# Allegro board 980XS-I6K51D-11120.brd

Outline 581.66 x 429.26 mm; copper layers: TOP, L02_GND, L03_DPS, L04_GND, L05_DPS, L06_GND, L07_DPS, L08_GND, L09_DPS, L10_GND, L11_DPS, L12_GND, L13_SIGNAL, L14_GND, L15_SIGNAL, L16_GND, L17_SIGNAL, L18_GND, L19_SIGNAL, L20_GND, L21_SIGNAL, L22_GND, L23_SIGNAL, L24_GND, L25_SIGNAL, L26_GND, L27_SIGNAL, L28_GND, L29_SIGNAL, L30_GND, L31_SIGNAL, L32_GND, L33_SIGNAL, L34_GND, L35_DPS, L36_UDB, L37_GND, BOTTOM. Coordinates in mm from the lower left corner of the outline.
Outline path: 0,429.26 206.45,429.26 arc(217.17,423.61) 227.89,429.26 353.77,429.26 arc(364.49,423.61) 375.21,429.26 581.66,429.26 581.66,0 301.55,0 arc(290.83,5.65) 280.11,0 0,0 0,429.26

## Placement (name value [footprint] x y rotation side)
BD5  BD120-1.5A-S4-MU  [FB0402]  543.47 239.79 270 bottom
BD9  BD120-1.5A-S4-MU  [FB0402]  224.66 243.83 270 bottom
BD21  BD120-1.5A-S4-MU  [FB0402]  222.95 232.36 0 bottom
BD1721  BD120-1.5A-S4-MU  [FB0402]  543.47 226.84 270 bottom
BD1722  BD120-1.5A-S4-MU  [FB0402]  543.09 213.5 270 bottom
BD1723  BD120-1.5A-S4-MU  [FB0402]  543.09 199.41 270 bottom
BD1728  BD120-1.5A-S4-MU  [FB0402]  245.15 273.73 180 bottom
BDB5  BD120-1.5A-S4-MU  [FB0402]  232.36 264.33 270 bottom
BDB6  BD120-1.5A-S4-MU  [FB0402]  220.55 264.33 270 bottom
BDB7  BD120-1.5A-S4-MU  [FB0402]  211.03 234.89 0 bottom
BDB8  BD120-1.5A-S4-MU  [FB0402]  211.03 246.46 0 bottom
BGA293-9X7-P0.4  REF-CODE-SOCKET  [SOCKET_CODE]  284.21 469.34 0 top
C262  0.1U-16-X7S-S2-MU  [C0201]  224.41 232.06 270 bottom
C264  NC/10U-16-X7R-S8-SS  [C0805]  243.28 276.07 0 bottom
C267  33P-50-N-S2-MU  [C0201]  236.23 224.18 270 bottom
C268  33P-50-N-S2-MU  [C0201]  235.23 224.18 270 bottom
C271  12P-50-N-S4-MU  [C0402]  240.52 270.61 90 bottom
C272  12P-50-N-S4-MU  [C0402]  240.52 272.63 270 bottom
C278  1U-10-X7S-S4-TDK  [C0402]  232.87 293.11 0 bottom
C279  1U-10-X7S-S4-TDK  [C0402]  232.87 291.92 0 bottom
C280  0.1U-16-X-S4-MU  [C0402]  232.87 290.72 0 bottom
C281  0.1U-16-X-S4-MU  [C0402]  232.87 289.53 0 bottom
C282  1U-10-X7S-S4-TDK  [C0402]  238.7 286.48 270 bottom
C283  0.1U-16-X-S4-MU  [C0402]  237.54 286.48 270 bottom
C284  1U-10-X7S-S4-TDK  [C0402]  237.62 297.85 90 bottom
C285  0.1U-16-X-S4-MU  [C0402]  238.81 297.85 90 bottom
C286  0.1U-16-X-S4-MU  [C0402]  233.82 297.35 180 bottom
C288  1000P-50-X7R-S2-MU  [C0201]  233.49 295.57 270 bottom
C289  0.1U-16-X-S4-MU  [C0402]  231.21 294.81 270 bottom
C290  NC/0.1U-16-X7R-S4-TY  [C0402]  224.35 296.03 180 bottom
C298  0.1U-16-X7S-S2-MU  [C0201]  222.95 292.65 90 bottom
C299  0.1U-16-X7S-S2-MU  [C0201]  220.02 296.97 180 bottom
C300  0.1U-16-X-S4-MU  [C0402]  220.67 290.87 270 bottom
C301  1U-10-X7S-S4-TDK  [C0402]  219.51 290.87 270 bottom
C302  10P-50-N-S2-MU  [C0201]  229.27 260.38 270 bottom
C309  10P-50-N-S2-MU  [C0201]  241.08 260.38 270 bottom
C310  10P-50-N-S2-MU  [C0201]  241.08 261.68 90 bottom
C318  10P-50-N-S2-MU  [C0201]  241.08 263.42 270 bottom
C320  10P-50-N-S2-MU  [C0201]  229.27 261.68 90 bottom
C332  2.2U-16-X7R-S6-TY  [C0603]  109.1 226.65 270 bottom
C333  0.1U-16-X-S4-MU  [C0402]  107.7 226.83 270 bottom
C334  10U-16-X7R-S8-SS  [C0805]  100.08 226.53 90 bottom
C335  0.1U-16-X-S4-MU  [C0402]  101.74 226.35 90 bottom
C336  4.7U-25-X7R-S8-TY  [C0805]  87.58 240.29 270 bottom
C337  0.1U-16-X-S4-MU  [C0402]  87.6 237.74 180 bottom
C338  4.7U-25-X7R-S8-TY  [C0805]  106 240.29 270 bottom
C339  0.1U-16-X-S4-MU  [C0402]  106.03 237.74 180 bottom
C400  2.2U-10-X-S4-MU  [C0402]  540.94 239.82 90 bottom
C401  0.1U-16-X-S4-MU  [C0402]  542.2 239.82 90 bottom
C402  4.7U-6.3-X-S4-MU  [C0402]  523.51 152.12 0 bottom
C403  22U-16-X5R-SA-SS  [C1206]  520.12 149.58 90 bottom
C404  10U-25-X-S6-MU  [C0603]  519.86 146.58 180 bottom
C405  1U-10-X7S-S4-TDK  [C0402]  520.37 145.26 180 bottom
C406  0.1U-16-X-S4-MU  [C0402]  90.42 287.53 180 bottom
C407  2.2U-10-X-S4-MU  [C0402]  82.6 288.09 270 bottom
C408  0.1U-16-X-S4-MU  [C0402]  83.74 288.09 270 bottom
C409  0.1U-16-X-S4-MU  [C0402]  73.71 296.14 0 bottom
C410  0.1U-16-X-S4-MU  [C0402]  508.66 225.73 270 bottom
C411  0.1U-16-X-S4-MU  [C0402]  498.63 233.78 0 bottom
C412  2.2U-10-X-S4-MU  [C0402]  507.51 225.73 270 bottom
C413  0.1U-16-X-S4-MU  [C0402]  515.33 225.16 180 bottom
C415  0.1U-16-X-S4-MU  [C0402]  90.42 273.81 180 bottom
C416  2.2U-10-X-S4-MU  [C0402]  82.6 274.38 270 bottom
C417  0.1U-16-X-S4-MU  [C0402]  73.71 282.43 0 bottom
C475  4.7U-6.3-X-S4-MU  [C0402]  256.72 272.09 270 bottom
C476  1U-10-X7S-S4-TDK  [C0402]  249.86 275.23 90 bottom
C477  10U-25-X-S6-MU  [C0603]  251.18 275.74 90 bottom
C478  22U-16-X5R-SA-SS  [C1206]  254.18 275.49 0 bottom
C894  0.1U-16-X-S4-MU  [C0402]  542.2 226.87 90 bottom
C895  2.2U-10-X-S4-MU  [C0402]  540.94 226.87 90 bottom
C910  0.1U-16-X-S4-MU  [C0402]  83.74 274.38 270 bottom
C922  0.1U-16-X-S4-MU  [C0402]  232.36 262.2 270 bottom
C923  0.1U-16-X-S4-MU  [C0402]  220.55 262.2 270 bottom
C924  10P-50-N-S2-MU  [C0201]  229.27 263.42 270 bottom
C955  0.1U-16-X-S4-MU  [C0402]  90.42 260.1 180 bottom
C956  2.2U-10-X-S4-MU  [C0402]  82.6 260.66 270 bottom
C957  0.1U-16-X-S4-MU  [C0402]  73.71 268.71 0 bottom
C958  0.1U-16-X-S4-MU  [C0402]  83.74 260.66 270 bottom
C983  0.1U-16-X-S4-MU  [C0402]  541.82 213.53 90 bottom
C984  2.2U-10-X-S4-MU  [C0402]  540.55 213.53 90 bottom
C985  0.1U-16-X-S4-MU  [C0402]  541.82 199.44 90 bottom
C986  2.2U-10-X-S4-MU  [C0402]  540.55 199.44 90 bottom
C1074  0.1U-16-X7S-S2-MU  [C0201_MINI]  243.6 273.98 90 bottom
C1082  0.1U-16-X-S4-MU  [C0402]  508.66 207.57 270 bottom
C1083  0.1U-16-X-S4-MU  [C0402]  248.15 224.79 0 bottom
C1085  2.2U-10-X-S4-MU  [C0402]  498.63 215.62 0 bottom
C1086  10P-50-N-S2-MU  [C0201]  214.98 255.18 0 bottom
C1087  10P-50-N-S2-MU  [C0201]  213.69 255.18 180 bottom
C1088  10P-50-N-S2-MU  [C0201]  211.94 255.18 0 bottom
C1089  0.1U-16-X-S4-MU  [C0402]  213.16 234.89 0 bottom
C1090  0.1U-16-X-S4-MU  [C0402]  213.16 246.46 0 bottom
C1091  10P-50-N-S2-MU  [C0201]  213.69 243.61 180 bottom
C1093  10P-50-N-S2-MU  [C0201]  214.98 243.61 0 bottom
CA1  0.1U-16-X-S4-MU  [C0402]  205.72 237.49 0 bottom
CA2  10U-25-X7R-SA  [C1206]  205.72 240.03 0 bottom
CA7  10U-25-X7R-SA  [C1206]  245.12 285.5 0 bottom
CA8  0.1U-16-X-S4-MU  [C0402]  245.12 283.46 0 bottom
CA19  470U-25-E-S10.4X10.4  [EC_10P3X10_S]  189.66 230.89 90 bottom
CA20  10U-25-X7R-SA  [C1206]  216.67 285.5 0 bottom
CA21  0.1U-16-X-S4-MU  [C0402]  216.67 283.46 0 bottom
CA22  10U-25-X7R-SA  [C1206]  222.76 281.43 0 bottom
CA23  0.1U-16-X-S4-MU  [C0402]  222.76 279.4 0 bottom
CA24  10U-25-X7R-SA  [C1206]  216.67 281.43 0 bottom
CA25  0.1U-16-X-S4-MU  [C0402]  216.67 279.4 0 bottom
CA26  10U-25-X7R-SA  [C1206]  235.18 281.43 0 bottom
CA27  0.1U-16-X-S4-MU  [C0402]  235.18 279.4 0 bottom
CA34  10U-25-X7R-SA  [C1206]  245.12 281.43 0 bottom
CA35  0.1U-16-X-S4-MU  [C0402]  245.12 279.4 0 bottom
CA36  0.1U-16-X-S4-MU  [C0402]  228.85 279.4 0 bottom
CA37  10U-25-X7R-SA  [C1206]  228.85 281.43 0 bottom
CA38  10U-25-X7R-SA  [C1206]  188.01 283.69 0 top
CA39  0.1U-16-X-S4-MU  [C0402]  206.26 242.54 0 top
CB1  0.1U-25-X-S6  [C0603]  416.81 133.35 0 bottom
CB2  10U-25-X7R-SA  [C1206]  416.81 130.81 0 bottom
CB3  0.1U-25-X-S6  [C0603]  560.07 133.35 0 bottom
CB4  10U-25-X7R-SA  [C1206]  560.07 130.81 0 bottom
CB5  0.1U-25-X-S6  [C0603]  560.07 295.91 180 bottom
CB6  10U-25-X7R-SA  [C1206]  560.07 298.45 180 bottom
CB7  0.1U-25-X-S6  [C0603]  424.16 290.83 180 bottom
CB8  10U-25-X7R-SA  [C1206]  424.16 293.37 180 bottom
CB9  0.1U-25-X-S6  [C0603]  164.85 133.35 0 bottom
CB10  10U-25-X7R-SA  [C1206]  164.85 130.81 0 bottom
CB11  0.1U-25-X-S6  [C0603]  157.46 290.83 180 bottom
CB12  10U-25-X7R-SA  [C1206]  157.46 293.37 180 bottom
CB13  0.1U-25-X-S6  [C0603]  21.59 133.35 0 bottom
CB14  10U-25-X7R-SA  [C1206]  21.59 130.81 0 bottom
CB15  0.1U-25-X-S6  [C0603]  21.59 295.91 180 bottom
CB16  10U-25-X7R-SA  [C1206]  21.59 298.45 180 bottom
CC1  0.1U-16-X7S-S2-MU  [C0201_MINI]  230.19 246.91 180 bottom
CC2  0.1U-16-X7S-S2-MU  [C0201_MINI]  230.5 250.48 90 bottom
CC3  0.1U-16-X7S-S2-MU  [C0201_MINI]  228.87 245.61 180 bottom
CC4  0.1U-16-X7S-S2-MU  [C0201_MINI]  230.19 246.26 180 bottom
CC5  0.1U-16-X7S-S2-MU  [C0201_MINI]  231.16 246.56 90 bottom
CC6  0.1U-16-X7S-S2-MU  [C0201_MINI]  228.87 244.96 180 bottom
CC7  0.1U-16-X7S-S2-MU  [C0201_MINI]  232.14 244.96 0 bottom
CC8  0.1U-16-X7S-S2-MU  [C0201_MINI]  230.5 243.97 270 bottom
CC9  0.1U-16-X7S-S2-MU  [C0201_MINI]  231.16 243.97 270 bottom
CC12  0.1U-16-X7S-S2-MU  [C0201_MINI]  229.86 244.62 270 bottom
CC13  0.1U-16-X7S-S2-MU  [C0201_MINI]  228.24 241.05 180 bottom
CC14  0.1U-16-X7S-S2-MU  [C0201_MINI]  231.46 245.61 0 bottom
CC15  0.1U-16-X7S-S2-MU  [C0201_MINI]  230.19 245.61 180 bottom
CC16  0.1U-16-X7S-S2-MU  [C0201_MINI]  230.84 244.96 180 bottom
CC70  0.1U-16-X7S-S2-MU  [C0201_MINI]  232.46 242.67 270 bottom
CC71  0.1U-16-X7S-S2-MU  [C0201_MINI]  235.38 243 0 bottom
CC73  0.1U-16-X7S-S2-MU  [C0201_MINI]  227.91 242.68 90 bottom
CC84  0.1U-16-X7S-S2-MU  [C0201_MINI]  233.11 250.48 90 bottom
CC85  0.1U-16-X7S-S2-MU  [C0201_MINI]  231.15 250.48 90 bottom
CC86  0.1U-16-X7S-S2-MU  [C0201_MINI]  232.46 250.48 90 bottom
CC87  0.1U-16-X7S-S2-MU  [C0201_MINI]  232.14 246.26 180 bottom
CC88  0.1U-16-X7S-S2-MU  [C0201_MINI]  233.11 244 270 bottom
CC89  0.1U-16-X7S-S2-MU  [C0201_MINI]  227.91 244.66 270 bottom
CC90  0.1U-16-X7S-S2-MU  [C0201_MINI]  231.8 250.48 90 bottom
CC91  0.1U-16-X7S-S2-MU  [C0201_MINI]  234.06 243.65 0 bottom
CC92  0.1U-16-X7S-S2-MU  [C0201_MINI]  232.45 244 270 bottom
CC96  0.1U-16-X7S-S2-MU  [C0201_MINI]  231.51 247.56 180 bottom
CC101  0.1U-16-X7S-S2-MU  [C0201_MINI]  230.84 240.4 0 bottom
CC103  0.1U-16-X7S-S2-MU  [C0201_MINI]  231.81 242.02 90 bottom
CC105  0.1U-16-X7S-S2-MU  [C0201_MINI]  232.46 240.72 270 bottom
CC112  0.1U-16-X7S-S2-MU  [C0201_MINI]  235.06 250.48 90 bottom
CC130  0.1U-16-X7S-S2-MU  [C0201_MINI]  228.24 241.7 180 bottom
CC182  0.1U-16-X7S-S2-MU  [C0201_MINI]  226.61 250.48 90 bottom
CC195  4.7U-25-X7R-S8-TY  [C0805]  187.38 280.77 0 top
CC202  0.1U-16-X7S-S2-MU  [C0201_MINI]  226.28 245.61 180 bottom
CC211  0.1U-16-X7S-S2-MU  [C0201_MINI]  230.5 242.02 90 bottom
CC212  0.1U-16-X7S-S2-MU  [C0201_MINI]  229.53 241.06 180 bottom
CC213  0.1U-16-X7S-S2-MU  [C0201_MINI]  231.16 242.02 90 bottom
CC214  0.1U-16-X7S-S2-MU  [C0201_MINI]  192.95 287.28 90 top
CC215  0.1U-16-X7S-S2-MU  [C0201_MINI]  231.81 239.42 90 bottom
CC216  0.1U-16-X7S-S2-MU  [C0201_MINI]  228.56 238.78 270 bottom
CC217  0.1U-16-X7S-S2-MU  [C0201_MINI]  194.35 287.28 90 top
CC218  0.1U-16-X7S-S2-MU  [C0201_MINI]  195.75 287.28 90 top
CC219  0.1U-16-X7S-S2-MU  [C0201_MINI]  197.15 287.28 90 top
CC220  0.1U-16-X7S-S2-MU  [C0201_MINI]  198.56 287.28 90 top
CON1  MS-PWR-CONN-30P-V3-SI6D70  [CONN_15X2_100MIL_PH_MS_V2]  24.74 150.36 90 top
CSDPS303  V93K_CSDPS_DPS32  [PG_VG93K_PF_DPS32_G1D303]  327.66 46.99 0 top
CSDPS307  V93K_CSDPS_DPS32  [PG_VG93K_PF_DPS32_G1D307]  401.32 46.99 0 top
CSDPS310  V93K_CSDPS_DPS32  [PG_VG93K_PF_DPS32_G2D310]  401.32 361.95 0 top
CSDPS314  V93K_CSDPS_DPS32  [PG_VG93K_PF_DPS32_G2D314]  327.66 361.95 0 top
CSDPS319  V93K_CSDPS_DPS32  [PG_VG93K_PF_DPS32_G3D319]  180.34 46.99 0 top
CSDPS323  V93K_CSDPS_DPS32  [PG_VG93K_PF_DPS32_G3D323]  254 46.99 0 top
CSDPS426  V93K_CSDPS  [PG_VG93K_PF_DPS32_G8D426]  254 361.95 0 top
CSDPS430  V93K_CSDPS  [PG_VG93K_PF_DPS32_G8D430]  180.34 361.95 0 top
D101  V93K_CH  [PG_VG93K_F_G1D101]  327.66 97.79 0 top
D102  V93K_CH  [PG_VG93K_F_G1D102]  327.66 77.47 0 top
D103  V93K_CH  [PG_VG93K_F_G1D103]  327.66 57.15 0 top
D104  V93K_CH  [PG_VG93K_F_G1D104]  327.66 36.83 0 top
D105  V93K_CH  [PG_VG93K_F_G1D105]  401.32 97.79 0 top
D106  V93K_CH  [PG_VG93K_F_G1D106]  401.32 77.47 0 top
D107  V93K_CH  [PG_VG93K_F_G1D107]  401.32 57.15 0 top
D108  V93K_CH  [PG_VG93K_F_G1D108]  401.32 36.83 0 top
D109  V93K_CH  [PG_VG93K_F_G2D109]  401.32 331.47 0 top
D110  V93K_CH  [PG_VG93K_F_G2D110]  401.32 351.79 0 top
D111  V93K_CH  [PG_VG93K_F_G2D111]  401.32 372.11 0 top
D112  V93K_CH  [PG_VG93K_F_G2D112]  401.32 392.43 0 top
D113  V93K_CH  [PG_VG93K_F_G2D113]  327.66 331.47 0 top
D114  V93K_CH  [PG_VG93K_F_G2D114]  327.66 351.79 0 top
D115  V93K_CH  [PG_VG93K_F_G2D115]  327.66 372.11 0 top
D116  V93K_CH  [PG_VG93K_F_G2D116]  327.66 392.43 0 top
D117  V93K_CH  [PG_VG93K_F_G3D117]  180.34 97.79 0 top
D118  V93K_CH  [PG_VG93K_F_G3D118]  180.34 77.47 0 top
D119  V93K_CH  [PG_VG93K_F_G3D119]  180.34 57.15 0 top
D120  V93K_CH  [PG_VG93K_F_G3D120]  180.34 36.83 0 top
D121  V93K_CH  [PG_VG93K_F_G3D121]  254 97.79 0 top
D122  V93K_CH  [PG_VG93K_F_G3D122]  254 77.47 0 top
D123  V93K_CH  [PG_VG93K_F_G3D123]  254 57.15 0 top
D124  V93K_CH  [PG_VG93K_F_G3D124]  254 36.83 0 top
D125  V93K_CH  [PG_VG93K_F_G4D125]  33.02 97.79 0 top
D126  V93K_CH  [PG_VG93K_F_G4D126]  33.02 77.47 0 top
D127  V93K_CH  [PG_VG93K_F_G4D127]  33.02 57.15 0 top
D128  V93K_CH  [PG_VG93K_F_G4D128]  33.02 36.83 0 top
D129  V93K_CH  [PG_VG93K_F_G4D129]  106.68 97.79 0 top
D130  V93K_CH  [PG_VG93K_F_G4D130]  106.68 77.47 0 top
D131  V93K_CH  [PG_VG93K_F_G4D131]  106.68 57.15 0 top
D132  V93K_CH  [PG_VG93K_F_G4D132]  106.68 36.83 0 top
D201  V93K_CH  [PG_VG93K_F_G5D201]  474.98 97.79 0 top
D202  V93K_CH  [PG_VG93K_F_G5D202]  474.98 77.47 0 top
D203  V93K_CH  [PG_VG93K_F_G5D203]  474.98 57.15 0 top
D204  V93K_CH  [PG_VG93K_F_G5D204]  474.98 36.83 0 top
D205  V93K_CH  [PG_VG93K_F_G5D205]  548.64 97.79 0 top
D206  V93K_CH  [PG_VG93K_F_G5D206]  548.64 77.47 0 top
D207  V93K_CH  [PG_VG93K_F_G5D207]  548.64 57.15 0 top
D208  V93K_CH  [PG_VG93K_F_G5D208]  548.64 36.83 0 top
D209  V93K_CH  [PG_VG93K_F_G6D209]  548.64 331.47 0 top
D210  V93K_CH  [PG_VG93K_F_G6D210]  548.64 351.79 0 top
D211  V93K_CH  [PG_VG93K_F_G6D211]  548.64 372.11 0 top
D212  V93K_CH  [PG_VG93K_F_G6D212]  548.64 392.43 0 top
D213  V93K_CH  [PG_VG93K_F_G6D213]  474.98 331.47 0 top
D214  V93K_CH  [PG_VG93K_F_G6D214]  474.98 351.79 0 top
D215  V93K_CH  [PG_VG93K_F_G6D215]  474.98 372.11 0 top
D216  V93K_CH  [PG_VG93K_F_G6D216]  474.98 392.43 0 top
D217  V93K_CH  [PG_VG93K_F_G7D217]  106.68 331.47 0 top
D218  V93K_CH  [PG_VG93K_F_G7D218]  106.68 351.79 0 top
D219  V93K_CH  [PG_VG93K_F_G7D219]  106.68 372.11 0 top
D220  V93K_CH  [PG_VG93K_F_G7D220]  106.68 392.43 0 top
D221  V93K_CH  [PG_VG93K_F_G7D221]  33.02 331.47 0 top
D222  V93K_CH  [PG_VG93K_F_G7D222]  33.02 351.79 0 top
D223  V93K_CH  [PG_VG93K_F_G7D223]  33.02 372.11 0 top
D224  V93K_CH  [PG_VG93K_F_G7D224]  33.02 392.43 0 top
D225  V93K_CH_ND  [PG_VG93K_F_G8D225_ND]  254 331.47 0 top
D226/D626  V93K_PS1600 HD  [PG_VG93K_F_HSM_G8D226_626_ND]  254 351.79 0 top
D227  V93K_CH  [PG_VG93K_F_G8D227]  254 372.11 0 top
D228  V93K_CH  [PG_VG93K_F_G8D228]  254 392.43 0 top
D229  V93K_CH_ND  [PG_VG93K_F_G8D229_ND]  180.34 331.47 0 top
D230/D630  V93K_PS1600 HD  [PG_VG93K_F_HSM_G8D230_630_ND]  180.34 351.79 0 top
D231  V93K_CH  [PG_VG93K_F_G8D231]  180.34 372.11 0 top
D232  V93K_CH  [PG_VG93K_F_G8D232]  180.34 392.43 0 top
D325  V93K_CH  [PG_VG93K_F_G4D325]  33.02 87.63 0 top
D326  V93K_CH  [PG_VG93K_F_G4D326]  33.02 67.31 0 top
D327  V93K_CH  [PG_VG93K_F_G4D327]  33.02 46.99 0 top
D328  V93K_CH  [PG_VG93K_F_G4D328]  33.02 26.67 0 top
D329  V93K_CH  [PG_VG93K_F_G4D329]  106.68 87.63 0 top
D330  V93K_CH  [PG_VG93K_F_G4D330]  106.68 67.31 0 top
D331  V93K_CH  [PG_VG93K_F_G4D331]  106.68 46.99 0 top
D332  V93K_CH  [PG_VG93K_F_G4D332]  106.68 26.67 0 top
D409  V93K_CH  [PG_VG93K_F_G6D409]  548.64 341.63 0 top
D410  V93K_CH  [PG_VG93K_F_G6D410]  548.64 361.95 0 top
D411  V93K_CH  [PG_VG93K_F_G6D411]  548.64 382.27 0 top
D412  V93K_CH  [PG_VG93K_F_G6D412]  548.64 402.59 0 top
D413  V93K_CH  [PG_VG93K_F_G6D413]  474.98 341.63 0 top
D414  V93K_CH  [PG_VG93K_F_G6D414]  474.98 361.95 0 top
D415  V93K_CH  [PG_VG93K_F_G6D415]  474.98 382.27 0 top
D416  V93K_CH  [PG_VG93K_F_G6D416]  474.98 402.59 0 top
D417  V93K_CH  [PG_VG93K_F_G7D417]  106.68 341.63 0 top
D418  V93K_CH  [PG_VG93K_F_G7D418]  106.68 361.95 0 top
D419  V93K_CH  [PG_VG93K_F_G7D419]  106.68 382.27 0 top
D420  V93K_CH  [PG_VG93K_F_G7D420]  106.68 402.59 0 top
D421  V93K_CH  [PG_VG93K_F_G7D421]  33.02 341.63 0 top
D422  V93K_CH  [PG_VG93K_F_G7D422]  33.02 361.95 0 top
D423  V93K_CH  [PG_VG93K_F_G7D423]  33.02 382.27 0 top
D424  V93K_CH  [PG_VG93K_F_G7D424]  33.02 402.59 0 top
D425  V93K_CH_ND  [PG_VG93K_F_G8D425_ND]  254 341.63 0 top
D427  V93K_CH  [PG_VG93K_F_G8D427]  254 382.27 0 top
D428  V93K_CH  [PG_VG93K_F_G8D428]  254 402.59 0 top
D429  V93K_CH_ND  [PG_VG93K_F_G8D429_ND]  180.34 341.63 0 top
D431  V93K_CH  [PG_VG93K_F_G8D431]  180.34 382.27 0 top
D432  V93K_CH  [PG_VG93K_F_G8D432]  180.34 402.59 0 top
DPS1  V93K_DPS  [PG_VG93K_F_G1DPS1]  401.32 16.51 0 top
DPS2  V93K_DPS  [PG_VG93K_F_G2DPS2]  327.66 412.75 0 top
DPS3  V93K_DPS  [PG_VG93K_F_G3DPS3]  254 16.51 0 top
DPS8  V93K_DPS  [PG_VG93K_F_G8DPS8]  180.34 412.75 0 top
FD1  -  [FD_040_V2]  10.16 129.54 0 top
FD2  -  [FD_040_V2]  11.43 298.45 0 top
FD3  -  [FD_040_V2]  157.48 298.45 0 top
FD4  -  [FD_040_V2]  157.48 130.81 0 top
FD5  -  [FD_040_V2]  424.18 298.45 0 top
FD6  -  [FD_040_V2]  424.18 130.81 0 top
FD7  -  [FD_040_V2]  570.23 298.45 0 top
FD8  -  [FD_040_V2]  570.23 130.81 0 top
FD9  -  [FD_040_V2]  10.16 129.54 180 bottom
FD10  -  [FD_040_V2]  11.43 298.45 180 bottom
FD11  -  [FD_040_V2]  157.48 298.45 180 bottom
FD12  -  [FD_040_V2]  157.48 130.81 180 bottom
FD13  -  [FD_040_V2]  424.18 298.45 180 bottom
FD14  -  [FD_040_V2]  424.18 130.81 180 bottom
FD15  -  [FD_040_V2]  570.23 298.45 180 bottom
FD16  -  [FD_040_V2]  570.23 130.81 180 bottom
H1  M3-HOLE  [M3_NPTH169]  158.75 241.3 0 top
H2  M3-HOLE  [M3_NPTH169]  158.75 187.96 0 top
H3  M3-HOLE  [M3_NPTH169]  422.91 241.3 0 top
H4  M3-HOLE  [M3_NPTH169]  422.91 187.96 0 top
J1  HDR-2X1-M  [JP_2P_100]  10.78 152.9 180 top
J2  HDR-2X1-M  [JP_2P_100]  14.16 152.9 180 top
JG261002WW011  REF-CODE-SOCKET  [SOCKET_CODE]  284.82 469.34 0 top
JP1  A2001WV0-4PS_V2  [CONN_S4X1_2MM_JWT]  100.37 260.08 90 top
K2  UA2-5NJ-A-V3  [RL_NECUA2_5V_V3]  119.04 248.1 90 bottom
K3  UA2-5NJ-A-V3  [RL_NECUA2_5V_V3]  112.69 248.1 90 bottom
K4  UA2-5NJ-A-V3  [RL_NECUA2_5V_V3]  106.34 248.1 90 bottom
K5  UA2-5NJ-A-V3  [RL_NECUA2_5V_V3]  99.99 248.1 90 bottom
K6  UA2-5NJ-A-V3  [RL_NECUA2_5V_V3]  93.64 248.1 90 bottom
K7  UA2-5NJ-A-V3  [RL_NECUA2_5V_V3]  87.29 248.1 90 bottom
K29  G6K-2F-Y-5V-A  [RL_G6K2F-Y_5V_OMRON]  231.89 271.62 0 bottom
K32  G6K-2F-Y-5V-A  [RL_G6K2F-Y_5V_OMRON]  235.73 231.79 270 bottom
K34  G6K-2P-Y5VDC-A  [RL_OMRONG6K2PY_5V]  166.88 269.24 90 bottom
K96  EC2-5NJ  [RL_NECEC2_10P_5V]  203.76 229.39 0 bottom
K109  G6K-2P-Y5VDC-A  [RL_OMRONG6K2PY_5V]  166.88 293.62 90 bottom
K110  G6K-2P-Y5VDC-A  [RL_OMRONG6K2PY_5V]  176.53 293.62 90 bottom
LDB1  LDG-2-S8  [LED_0805]  40.96 298.45 0 top
LOGO1  LOGO_SR_SigmaStar  [LOGO_SR_SIGMASTAR]  29.16 434.98 0 top
LOGO2  -  [LOGO_KT_KSMT]  81.21 434.37 0 top
LRB1  330-1-S6  [R0603]  42.89 298.45 180 bottom
MBD1  BD120-1.5A-S4-MU  [FB0402]  222.95 294.3 270 bottom
MK1  AQY221R2MY-V2  [RL_AQY221R2MY_5V_V2]  225.87 288.33 180 bottom
MK2  AQY221R2MY-V2  [RL_AQY221R2MY_5V_V2]  225.87 293.67 180 bottom
MK3  AQY221R2MY-V2  [RL_AQY221R2MY_5V_V2]  225.87 285.79 180 bottom
MK4  AQY221R2MY-V2  [RL_AQY221R2MY_5V_V2]  225.87 291 180 bottom
MR1  1M-1-S4  [R0402_UNBGA_V2]  236.22 286.48 270 bottom
MR2  1K-0.01-S4  [R0402_UNBGA_V2]  235.91 297.35 180 bottom
MR3  1K-0.01-S4  [R0402_UNBGA_V2]  233.82 298.37 180 bottom
MR4  1K-0.01-S4  [R0402_UNBGA_V2]  233.82 299.38 180 bottom
MR5  1K-0.01-S4  [R0402_UNBGA_V2]  235.91 299.38 0 bottom
MR6  1K-0.01-S4  [R0402_UNBGA_V2]  235.91 298.37 0 bottom
MR7  332K-1-S4  [R0402_UNBGA_V2]  235.21 285.63 90 bottom
MR8  1K-0.01-S4  [R0402_UNBGA_V2]  224.35 299.38 180 bottom
MR9  499-0.1-S4  [R0402]  224.35 298.27 180 bottom
MR10  0-5-S4  [R0402]  224.35 297.15 0 bottom
MR11  750-1-S4  [R0402]  229.3 288.97 180 bottom
MR12  360-1-S6  [R0603]  229.68 287.7 180 bottom
MR13  750-1-S4  [R0402]  229.3 294.3 180 bottom
MR14  1.2K-1-S4  [R0402]  229.05 286.43 0 bottom
MR15  360-1-S6  [R0603]  229.68 293.03 180 bottom
MR16  750-1-S4  [R0402]  229.3 291.64 180 bottom
MR17  360-1-S6  [R0603]  229.68 290.37 180 bottom
MR18  11K-0.1-S4  [R0402]  221.81 290.87 270 bottom
MR19  1K-0.01-S4  [R0402_UNBGA_V2]  222.95 290.87 90 bottom
MU1  KSMT002-0.15A-A-SC70-5  [SC70_5P]  233.15 287.63 90 bottom
MU2  KSMT004-SO8  [SO8_244X127MM]  238.06 292.02 90 bottom
MU3  KSMT003-MSOP8  [SO8_172X0P65MM]  228.92 297.48 180 bottom
MU4  MAX6070AAUT30+T-SOT23  [SOT23_6P_0P95X2P7MM_H1P45MM]  220.67 294.3 0 bottom
NOREF  -  []  347.95 259.98 0 top
NOREF#2  -  []  271.6 189.57 90 top
NOREF#3  -  []  308.17 137.2 90 top
NOREF#4  -  []  318.57 231.63 90 top
NOREF#5  -  []  223.09 232.9 0 top
NOREF#6  -  []  539.45 207.04 0 top
NOREF#7  -  []  267.57 245.37 90 top
NOREF#8  -  []  97.99 157.1 90 top
NOREF#9  -  []  348.25 234.12 0 top
NOREF#10  -  []  226.54 135.09 0 top
NOREF#11  -  []  464.88 221.76 0 top
NOREF#12  -  []  271.89 246.26 0 top
NOREF#13  -  []  277.62 260.2 90 top
NOREF#14  -  []  47.51 484.4 0 top
NOREF#15  -  []  354.48 182.93 90 top
NOREF#16  -  []  107.85 225.8 90 top
NOREF#17  -  []  302.45 231.5 0 top
NOREF#18  -  []  345.05 146.58 0 top
NOREF#19  -  []  474.12 240.61 0 top
NOREF#20  -  []  338.17 209.61 90 top
NOREF#21  -  []  307.41 133.69 0 top
NOREF#22  -  []  308.31 262.82 0 top
NOREF#23  -  []  235.81 242.28 90 top
NOREF#24  -  []  32.07 484.4 0 top
NOREF#25  -  []  223.27 174.62 0 top
NOREF#26  -  []  333.22 250.39 90 top
NOREF#27  -  []  272.8 247.31 90 top
NOREF#28  -  []  240.76 199.88 0 top
NOREF#29  -  []  311.21 245.61 0 top
NOREF#30  -  []  355.12 298.76 90 top
NOREF#31  -  []  493.02 174.24 0 top
NOREF#32  -  []  340.96 187.12 90 top
NOREF#33  -  []  343.27 292.05 0 top
NOREF#34  -  []  275.44 194.76 90 top
NOREF#35  -  []  384.34 483.75 90 top
NOREF#36  -  []  463.17 137.52 90 top
NOREF#37  -  []  95.99 217.95 0 top
NOREF#38  -  []  333.22 178.82 0 top
NOREF#39  -  []  276.22 286.06 90 top
NOREF#40  -  []  239.02 199.8 90 top
NOREF#41  -  []  255.16 191.22 90 top
NOREF#42  -  []  282.43 269.89 0 top
NOREF#43  -  []  302.95 290.44 90 top
NOREF#44  -  []  104.48 140.9 90 top
NOREF#45  -  []  47.3 483.76 90 top
NOREF#46  -  []  347.25 174.3 90 top
NOREF#47  -  []  330.61 235.6 90 top
NOREF#48  -  []  347.7 189.57 90 top
NOREF#49  -  []  230.5 183.72 90 top
NOREF#50  -  []  272.04 190.05 0 top
NOREF#51  -  []  210.56 192.32 0 top
NOREF#52  -  []  315.12 298.76 90 top
NOREF#53  -  []  265.48 233.73 90 top
NOREF#54  -  []  493.48 250.31 90 top
NOREF#55  -  []  269.96 241.3 0 top
NOREF#56  -  []  269.94 246.26 0 top
NOREF#57  -  []  293.22 238.82 90 top
NOREF#58  -  []  270.74 250.05 0 top
NOREF#59  -  []  264.96 136.89 0 top
NOREF#60  -  []  83.67 275.75 0 top
NOREF#61  -  []  98.19 186.2 0 top
NOREF#62  -  []  230.48 184.57 90 top
NOREF#63  -  []  87.81 240.82 0 top
NOREF#64  -  []  329.83 263.63 90 top
NOREF#65  -  []  242.43 213.73 0 top
NOREF#66  -  []  225.14 298.99 90 top
NOREF#67  -  []  234.95 182.76 0 top
NOREF#68  -  []  342.95 292.35 90 top
NOREF#69  -  []  231.16 181.77 90 top
NOREF#70  -  []  351.89 186.26 0 top
NOREF#71  -  []  471.23 253.51 0 top
NOREF#72  -  []  303.27 175.18 0 top
NOREF#73  -  []  231.16 186.31 90 top
NOREF#74  -  []  38.32 299.45 0 top
NOREF#75  -  []  275.19 208.15 90 top
NOREF#76  -  []  351.48 185.37 90 top
NOREF#77  -  []  95.24 156.45 0 top
NOREF#78  -  []  311.89 184.89 90 top
NOREF#79  -  []  271.78 183.92 90 top
NOREF#80  -  []  271.8 190.23 90 top
NOREF#81  -  []  353.34 250.05 0 top
NOREF#82  -  []  271.78 243.92 90 top
NOREF#83  -  []  -556.17 324.82 0 top
NOREF#84  -  []  269.27 261.38 90 top
NOREF#85  -  []  265.33 135.72 0 top
NOREF#86  -  []  225.31 260.2 0 top
NOREF#87  -  []  451.08 161.06 0 top
NOREF#88  -  []  80.24 189 0 top
NOREF#89  -  []  353.63 143.53 0 top
NOREF#90  -  []  304.52 293.03 90 top
NOREF#91  -  []  307.7 189.57 90 top
NOREF#92  -  []  270.5 250.23 90 top
NOREF#93  -  []  295.58 243.29 90 top
NOREF#94  -  []  228.01 174.3 90 top
NOREF#95  -  []  294.29 195.5 0 top
NOREF#96  -  []  303.46 484.08 0 top
NOREF#97  -  []  346.54 135.09 0 top
NOREF#98  -  []  315.13 183 0 top
NOREF#99  -  []  303.27 292.05 0 top
NOREF#100  -  []  229.96 241.3 0 top
NOREF#101  -  []  80.24 157.25 0 top
NOREF#102  -  []  473.2 133.68 90 top
NOREF#103  -  []  128.92 417.57 90 top
NOREF#104  -  []  352.13 244.72 90 top
NOREF#105  -  []  251.16 236.15 90 top
NOREF#106  -  []  348.31 262.82 0 top
NOREF#107  -  []  325.83 229.63 90 top
NOREF#108  -  []  -569.19 267.18 90 top
NOREF#109  -  []  306.03 185.61 0 top
NOREF#110  -  []  158.26 484.08 0 top
NOREF#111  -  []  473.2 197.18 90 top
NOREF#112  -  []  234.75 286.43 0 top
NOREF#113  -  []  274.97 145.37 90 top
NOREF#114  -  []  351.48 246.66 90 top
NOREF#115  -  []  470.13 256.31 0 top
NOREF#116  -  []  295.01 193.56 0 top
NOREF#117  -  []  227 259.85 0 top
NOREF#118  -  []  223.95 173.34 90 top
NOREF#119  -  []  214.68 193.86 90 top
NOREF#120  -  []  313.62 183.41 0 top
NOREF#121  -  []  458.37 212.88 0 top
NOREF#122  -  []  230.5 190.23 90 top
NOREF#123  -  []  346.84 148.23 90 top
NOREF#124  -  []  295.58 194.22 90 top
NOREF#125  -  []  485.26 174.88 0 top
NOREF#126  -  []  479.53 253.51 0 top
NOREF#127  -  []  456.13 256.16 90 top
NOREF#128  -  []  353.43 246.02 90 top
NOREF#129  -  []  254.38 243.29 0 top
NOREF#130  -  []  101.59 251.7 0 top
NOREF#131  -  []  466.83 253.51 0 top
NOREF#132  -  []  369.03 276.59 90 top
NOREF#133  -  []  227.25 234.3 90 top
NOREF#134  -  []  314.37 295.53 90 top
NOREF#135  -  []  235.23 163.88 90 top
NOREF#136  -  []  314.21 249.57 90 top
NOREF#137  -  []  72.69 293.24 0 top
NOREF#138  -  []  366.32 466.58 90 top
NOREF#139  -  []  277.14 141.43 90 top
NOREF#140  -  []  239.47 201.5 90 top
NOREF#141  -  []  351.39 250.05 0 top
NOREF#142  -  []  80.94 278.6 0 top
NOREF#143  -  []  302.95 292.35 90 top
NOREF#144  -  []  226.36 194.55 90 top
NOREF#145  -  []  317.49 261.06 90 top
NOREF#146  -  []  351.27 179.68 90 top
NOREF#147  -  []  103.28 139.01 0 top
NOREF#148  -  []  547.34 224.07 0 top
NOREF#149  -  []  308.03 289.54 0 top
NOREF#150  -  []  227.25 173.9 90 top
NOREF#151  -  []  251.96 182 0 top
NOREF#152  -  []  311.39 250.05 0 top
NOREF#153  -  []  342.45 171.5 0 top
NOREF#154  -  []  82.01 274.46 0 top
NOREF#155  -  []  232.45 183.76 90 top
NOREF#156  -  []  114.29 188.2 0 top
NOREF#157  -  []  308.31 179.21 0 top
NOREF#158  -  []  308.25 234.12 0 top
NOREF#159  -  []  228.95 202.82 90 top
NOREF#160  -  []  313.08 240.67 90 top
NOREF#161  -  []  98.19 249.7 0 top
NOREF#162  -  []  322.43 273.73 0 top
NOREF#163  -  []  239.77 263.72 0 top
NOREF#164  -  []  312.05 181.59 0 top
NOREF#165  -  []  547.86 198.36 0 top
NOREF#166  -  []  239.47 199.85 90 top
NOREF#167  -  []  308.01 174.3 90 top
NOREF#168  -  []  -554.09 324.58 90 top
NOREF#169  -  []  211.31 194.76 0 top
NOREF#170  -  []  369.83 162.63 90 top
NOREF#171  -  []  348.17 137.2 90 top
NOREF#172  -  []  -552.84 394.4 0 top
NOREF#173  -  []  249.83 263.63 90 top
NOREF#174  -  []  466.83 253.51 0 top
NOREF#175  -  []  196.37 286.37 90 top
NOREF#176  -  []  213.61 253.56 90 top
NOREF#177  -  []  111.42 191.22 0 top
NOREF#178  -  []  458.37 231.62 0 top
NOREF#179  -  []  265.33 134.7 0 top
NOREF#180  -  []  354.23 187.83 0 top
NOREF#181  -  []  294.31 193.56 0 top
NOREF#182  -  []  227.65 200.55 90 top
NOREF#183  -  []  473.22 208.53 0 top
NOREF#184  -  []  221.81 204.2 0 top
NOREF#185  -  []  311.78 243.92 90 top
NOREF#186  -  []  270.01 210.51 0 top
NOREF#187  -  []  212.13 13.07 0 top
NOREF#188  -  []  198.32 286.85 0 top
NOREF#189  -  []  224.09 172.66 0 top
NOREF#190  -  []  232.05 178.99 0 top
NOREF#191  -  []  309.94 185.61 0 top
NOREF#192  -  []  99.29 189 0 top
NOREF#193  -  []  102.38 233.93 0 top
NOREF#194  -  []  317.11 164.14 90 top
NOREF#195  -  []  350.74 250.05 0 top
NOREF#196  -  []  266.41 254.4 90 top
NOREF#197  -  []  279.1 143.77 0 top
NOREF#198  -  []  311.16 241.77 90 top
NOREF#199  -  []  239.47 259.15 90 top
NOREF#200  -  []  278.82 262.2 0 top
NOREF#201  -  []  278.82 259.85 0 top
NOREF#202  -  []  88.89 156.45 0 top
NOREF#203  -  []  460.48 221.76 0 top
NOREF#204  -  []  314.91 164.78 0 top
NOREF#205  -  []  300.96 187.12 90 top
NOREF#206  -  []  66.31 248.1 0 top
NOREF#207  -  []  276.7 296.96 90 top
NOREF#208  -  []  334.31 242 90 top
NOREF#209  -  []  104.54 249.7 0 top
NOREF#210  -  []  259.9 268.32 90 top
NOREF#211  -  []  401.33 417.57 90 top
NOREF#212  -  []  264.91 233.9 0 top
NOREF#213  -  []  214.68 255.18 0 top
NOREF#214  -  []  487.26 195.03 90 top
NOREF#215  -  []  335.71 193.56 0 top
NOREF#216  -  []  235.12 298.76 90 top
NOREF#217  -  []  230.62 187.15 0 top
NOREF#218  -  []  267.65 259.15 90 top
NOREF#219  -  []  293.86 181.35 90 top
NOREF#220  -  []  293.61 242 90 top
NOREF#221  -  []  274.44 144.1 0 top
NOREF#222  -  []  -558.98 324.82 0 top
NOREF#223  -  []  276.29 260.94 90 top
NOREF#224  -  []  350.5 181.77 90 top
NOREF#225  -  []  266.89 260.1 90 top
NOREF#226  -  []  485.13 223.76 0 top
NOREF#227  -  []  358.7 260.1 90 top
NOREF#228  -  []  114.42 171.07 0 top
NOREF#229  -  []  540.03 220.67 90 top
NOREF#230  -  []  91.84 249.7 0 top
NOREF#231  -  []  317.95 138.45 90 top
NOREF#232  -  []  252.96 254.76 0 top
NOREF#233  -  []  245.64 136.62 90 top
NOREF#234  -  []  490.28 253.51 0 top
NOREF#235  -  []  305.48 233.73 90 top
NOREF#236  -  []  242.43 269.89 0 top
NOREF#237  -  []  504.91 209.19 90 top
NOREF#238  -  []  344.52 285.16 90 top
NOREF#239  -  []  267.65 261.5 90 top
NOREF#240  -  []  295.38 242.3 90 top
NOREF#241  -  []  106.74 217.95 0 top
NOREF#242  -  []  -551.44 394.4 0 top
NOREF#243  -  []  232.21 184.43 0 top
NOREF#244  -  []  145.45 484.32 0 top
NOREF#245  -  []  270.41 180.16 0 top
NOREF#246  -  []  459.73 255.51 0 top
NOREF#247  -  []  356.23 163.88 90 top
NOREF#248  -  []  229.86 244.37 90 top
NOREF#249  -  []  210.56 187.12 90 top
NOREF#250  -  []  242.43 212.37 0 top
NOREF#251  -  []  261.21 254.4 0 top
NOREF#252  -  []  226.84 148.23 90 top
NOREF#253  -  []  352.2 288.28 0 top
NOREF#254  -  []  228.56 238.53 90 top
NOREF#255  -  []  264.41 231.76 90 top
NOREF#256  -  []  86.2 278.73 90 top
NOREF#257  -  []  234.44 141.43 0 top
NOREF#258  -  []  458.53 253.51 0 top
NOREF#259  -  []  98.19 154.45 0 top
NOREF#260  -  []  232.22 243.1 0 top
NOREF#261  -  []  227.65 199.85 90 top
NOREF#262  -  []  483.26 235.88 0 top
NOREF#263  -  []  545.19 171.5 0 top
NOREF#264  -  []  270.74 241.59 0 top
NOREF#265  -  []  308.55 238.53 90 top
NOREF#266  -  []  349.94 245.61 0 top
NOREF#267  -  []  333.29 253.86 90 top
NOREF#268  -  []  505.85 211.79 0 top
NOREF#269  -  []  230.75 250.05 0 top
NOREF#270  -  []  213.66 194.76 0 top
NOREF#271  -  []  350.62 246.5 0 top
NOREF#272  -  []  267.99 181.7 0 top
NOREF#273  -  []  314.1 286.98 90 top
NOREF#274  -  []  272.22 183.1 0 top
NOREF#275  -  []  307.95 263.03 0 top
NOREF#276  -  []  -557.58 324.82 0 top
NOREF#277  -  []  534.31 235.5 0 top
NOREF#278  -  []  307 258.45 0 top
NOREF#279  -  []  345.81 260.2 90 top
NOREF#280  -  []  255.83 259.63 0 top
NOREF#281  -  []  483.26 172.38 90 top
NOREF#282  -  []  313.3 208.63 90 top
NOREF#283  -  []  503.71 229.25 0 top
NOREF#284  -  []  332.66 193.56 0 top
NOREF#285  -  []  350.91 184.4 0 top
NOREF#286  -  []  78.8 277.9 0 top
NOREF#287  -  []  293.34 484.4 0 top
NOREF#288  -  []  331.64 255.18 0 top
NOREF#289  -  []  268.09 268.12 0 top
NOREF#290  -  []  41.69 483.76 90 top
NOREF#291  -  []  269.53 240.81 90 top
NOREF#292  -  []  306.84 190.05 0 top
NOREF#293  -  []  106.74 154.45 0 top
NOREF#294  -  []  408.19 483.75 90 top
NOREF#295  -  []  220.62 297.29 0 top
NOREF#296  -  []  297.35 483.75 90 top
NOREF#297  -  []  548.24 237.35 0 top
NOREF#298  -  []  456.33 190.01 0 top
NOREF#299  -  []  154.91 290.38 90 top
NOREF#300  -  []  101.59 219.95 0 top
NOREF#301  -  []  49.74 246.93 90 top
NOREF#302  -  []  229.69 136.26 90 top
NOREF#303  -  []  352.26 185.65 90 top
NOREF#304  -  []  292.66 193.56 0 top
NOREF#305  -  []  347.95 261.38 0 top
NOREF#306  -  []  460.48 221.76 0 top
NOREF#307  -  []  80.24 252.5 0 top
NOREF#308  -  []  251.83 206.63 0 top
NOREF#309  -  []  347.95 263.03 0 top
NOREF#310  -  []  243.84 212.69 90 top
NOREF#311  -  []  233.56 189.57 90 top
NOREF#312  -  []  358.57 231.63 90 top
NOREF#313  -  []  240.12 262.82 0 top
NOREF#314  -  []  267 259.85 0 top
NOREF#315  -  []  313.17 296.17 0 top
NOREF#316  -  []  97.76 165.86 0 top
NOREF#317  -  []  493.02 240.28 0 top
NOREF#318  -  []  86.2 289.54 90 top
NOREF#319  -  []  365.83 229.63 90 top
NOREF#320  -  []  273.62 264.2 0 top
NOREF#321  -  []  295.01 182 0 top
NOREF#322  -  []  234.95 242.76 0 top
NOREF#323  -  []  547.86 212.46 0 top
NOREF#324  -  []  342.22 296.45 90 top
NOREF#325  -  []  116.29 183 90 top
NOREF#326  -  []  102.24 224.64 90 top
NOREF#327  -  []  -559.16 325.06 0 top
NOREF#328  -  []  357.14 141.43 90 top
NOREF#329  -  []  266.63 181.83 90 top
NOREF#330  -  []  362.09 484.4 0 top
NOREF#331  -  []  321.2 483.75 90 top
NOREF#332  -  []  255.58 182.65 90 top
NOREF#333  -  []  83.2 262.88 90 top
NOREF#334  -  []  300.81 187.17 90 top
NOREF#335  -  []  84.1 292.77 0 top
NOREF#336  -  []  80.69 260.01 90 top
NOREF#337  -  []  253.66 243.2 0 top
NOREF#338  -  []  307.05 135.87 0 top
NOREF#339  -  []  316.11 164.14 90 top
NOREF#340  -  []  130.05 260.06 90 top
NOREF#341  -  []  311.81 181.77 90 top
NOREF#342  -  []  313.07 254.55 0 top
NOREF#343  -  []  269.27 260.08 90 top
NOREF#344  -  []  270.55 134.62 90 top
NOREF#345  -  []  293.22 178.82 0 top
NOREF#346  -  []  224.52 287.7 90 top
NOREF#347  -  []  347.66 245.09 0 top
NOREF#348  -  []  323.84 272.69 90 top
NOREF#349  -  []  210.56 240.75 0 top
NOREF#350  -  []  294.36 181.55 0 top
NOREF#351  -  []  242.43 211.37 90 top
NOREF#352  -  []  310.16 244.72 90 top
NOREF#353  -  []  232.05 241.59 0 top
NOREF#354  -  []  295.71 242 90 top
NOREF#355  -  []  213.1 238.82 90 top
NOREF#356  -  []  242.54 140.92 0 top
NOREF#357  -  []  44.7 484.4 0 top
NOREF#358  -  []  303.27 173.14 0 top
NOREF#359  -  []  357.95 138.45 90 top
NOREF#360  -  []  254.29 195.5 0 top
NOREF#361  -  []  229.61 185.05 0 top
NOREF#362  -  []  323.06 270.76 90 top
NOREF#363  -  []  233.63 143.53 0 top
NOREF#364  -  []  350.74 241.59 0 top
NOREF#365  -  []  231.81 181.77 90 top
NOREF#366  -  []  251.16 240.15 0 top
NOREF#367  -  []  305.33 134.7 0 top
NOREF#368  -  []  349.85 184.37 90 top
NOREF#369  -  []  306.54 134.31 90 top
NOREF#370  -  []  272.26 185.65 90 top
NOREF#371  -  []  295.01 242 90 top
NOREF#372  -  []  277.14 144.1 90 top
NOREF#373  -  []  485.88 190.01 0 top
NOREF#374  -  []  238.82 261.5 0 top
NOREF#375  -  []  354.97 467.63 0 top
NOREF#376  -  []  107.85 194.05 90 top
NOREF#377  -  []  311.19 209.1 90 top
NOREF#378  -  []  343.09 232.9 0 top
NOREF#379  -  []  228.62 245.61 0 top
NOREF#380  -  []  292.96 254.76 0 top
NOREF#381  -  []  534.61 222.87 0 top
NOREF#382  -  []  333.39 243.61 0 top
NOREF#383  -  []  67.34 267.3 90 top
NOREF#384  -  []  495.12 176.46 90 top
NOREF#385  -  []  -567.24 267.66 0 top
NOREF#386  -  []  274.61 298.99 90 top
NOREF#387  -  []  314.39 484.4 0 top
NOREF#388  -  []  46.1 484.4 0 top
NOREF#389  -  []  109.94 151.25 90 top
NOREF#390  -  []  314.95 182.76 0 top
NOREF#391  -  []  337.83 192.37 0 top
NOREF#392  -  []  241.04 135.78 0 top
NOREF#393  -  []  214.36 241.55 0 top
NOREF#394  -  []  225.05 145.8 90 top
NOREF#395  -  []  534.61 221.48 0 top
NOREF#396  -  []  348.01 173.3 90 top
NOREF#397  -  []  352.21 244.43 0 top
NOREF#398  -  []  273.17 296.17 0 top
NOREF#399  -  []  308.78 484.4 0 top
NOREF#400  -  []  232.35 289.79 90 top
NOREF#401  -  []  263.95 234.46 90 top
NOREF#402  -  []  312.23 170.19 90 top
NOREF#403  -  []  456.33 221.76 0 top
NOREF#404  -  []  312.05 241.59 0 top
NOREF#405  -  []  223.95 174.46 90 top
NOREF#406  -  []  285.95 273.47 0 top
NOREF#407  -  []  59.94 196.2 0 top
NOREF#408  -  []  303.95 233.9 90 top
NOREF#409  -  []  351.48 246.02 90 top
NOREF#410  -  []  274.44 141.43 0 top
NOREF#411  -  []  317.95 143.66 90 top
NOREF#412  -  []  301.84 204.24 0 top
NOREF#413  -  []  333.22 240.02 0 top
NOREF#414  -  []  308.31 239.21 0 top
NOREF#415  -  []  231.48 186.02 90 top
NOREF#416  -  []  295.71 253.56 90 top
NOREF#417  -  []  311.6 189.57 90 top
NOREF#418  -  []  254.38 254.86 0 top
NOREF#419  -  []  225.68 201.06 90 top
NOREF#420  -  []  534.61 231.63 0 top
NOREF#421  -  []  313.43 246.02 90 top
NOREF#422  -  []  541.95 196.24 90 top
NOREF#423  -  []  313.62 243.41 0 top
NOREF#424  -  []  548.24 234.56 0 top
NOREF#425  -  []  335.49 183.29 90 top
NOREF#426  -  []  290.61 235.6 90 top
NOREF#427  -  []  344.11 467.68 0 top
NOREF#428  -  []  335.49 194.86 90 top
NOREF#429  -  []  346.84 190.05 0 top
NOREF#430  -  []  277.95 141.12 90 top
NOREF#431  -  []  295.56 240.9 90 top
NOREF#432  -  []  349.04 201.34 90 top
NOREF#433  -  []  230.62 186.5 0 top
NOREF#434  -  []  142.65 484.32 0 top
NOREF#435  -  []  468.6 201.42 0 top
NOREF#436  -  []  270.5 190.23 90 top
NOREF#437  -  []  359.02 259.8 90 top
NOREF#438  -  []  85.83 143.59 90 top
NOREF#439  -  []  289.83 203.63 90 top
NOREF#440  -  []  87.81 240.82 0 top
NOREF#441  -  []  549.44 222.35 90 top
NOREF#442  -  []  214.66 192.79 0 top
NOREF#443  -  []  227.09 206.12 0 top
NOREF#444  -  []  268.25 233.12 0 top
NOREF#445  -  []  275.12 300.55 0 top
NOREF#446  -  []  353.8 243.65 0 top
NOREF#447  -  []  347.57 185.37 90 top
NOREF#448  -  []  228.31 262.82 0 top
NOREF#449  -  []  290.61 252.27 0 top
NOREF#450  -  []  227.65 199.15 90 top
NOREF#451  -  []  110.69 188.85 90 top
NOREF#452  -  []  474.12 145.36 0 top
NOREF#453  -  []  334.68 242.3 90 top
NOREF#454  -  []  352.91 241.11 90 top
NOREF#455  -  []  335.38 193.86 90 top
NOREF#456  -  []  312.57 186.5 0 top
NOREF#457  -  []  215.01 253.56 90 top
NOREF#458  -  []  348.25 233.12 0 top
NOREF#459  -  []  227.95 260.68 0 top
NOREF#460  -  []  79.1 264.51 0 top
NOREF#461  -  []  473.18 158.26 0 top
NOREF#462  -  []  267.25 173.9 90 top
NOREF#463  -  []  148.26 484.32 0 top
NOREF#464  -  []  92.94 252.5 0 top
NOREF#465  -  []  344.41 231.76 90 top
NOREF#466  -  []  350.62 187.15 0 top
NOREF#467  -  []  331.64 195.18 0 top
NOREF#468  -  []  263.09 232.9 0 top
NOREF#469  -  []  294.31 242 90 top
NOREF#470  -  []  296.21 181.35 90 top
NOREF#471  -  []  231.16 246.31 90 top
NOREF#472  -  []  346.03 185.61 0 top
NOREF#473  -  []  80.24 157.25 0 top
NOREF#474  -  []  77.67 261.24 0 top
NOREF#475  -  []  352.23 170.19 90 top
NOREF#476  -  []  462.68 190.01 0 top
NOREF#477  -  []  242.68 272.85 0 top
NOREF#478  -  []  102.34 249.7 0 top
NOREF#479  -  []  86.2 263.56 90 top
NOREF#480  -  []  454.13 190.01 0 top
NOREF#481  -  []  271.6 241.11 90 top
NOREF#482  -  []  87.81 196.06 90 top
NOREF#483  -  []  264.24 207.14 0 top
NOREF#484  -  []  334.68 182.3 90 top
NOREF#485  -  []  325.64 136.62 90 top
NOREF#486  -  []  265.29 232.02 90 top
NOREF#487  -  []  351.08 209.73 0 top
NOREF#488  -  []  268.25 173.12 0 top
NOREF#489  -  []  308.49 136.9 0 top
NOREF#490  -  []  271.15 190.23 90 top
NOREF#491  -  []  350.41 180.16 0 top
NOREF#492  -  []  535.51 232.06 90 top
NOREF#493  -  []  303.95 172.42 90 top
NOREF#494  -  []  307.17 483.75 90 top
NOREF#495  -  []  362.43 273.73 0 top
NOREF#496  -  []  210.61 235.6 90 top
NOREF#497  -  []  357.62 260.2 90 top
NOREF#498  -  []  493.92 206.32 0 top
NOREF#499  -  []  275.69 268.12 90 top
NOREF#500  -  []  10.78 2.28 90 top
NOREF#501  -  []  233.62 264.2 0 top
NOREF#502  -  []  161.75 483.84 90 top
NOREF#503  -  []  347.65 261.5 90 top
NOREF#504  -  []  347.99 181.7 0 top
NOREF#505  -  []  155.27 484.32 0 top
NOREF#506  -  []  312.22 241.15 0 top
NOREF#507  -  []  482.83 192.81 0 top
NOREF#508  -  []  86.2 292.44 90 top
NOREF#509  -  []  211.83 266.63 0 top
NOREF#510  -  []  236.84 201.06 0 top
NOREF#511  -  []  272.91 178.51 90 top
NOREF#512  -  []  347.65 262.2 90 top
NOREF#513  -  []  236.52 134.08 90 top
NOREF#514  -  []  -566.93 197.04 0 top
NOREF#515  -  []  103.64 134.34 0 top
NOREF#516  -  []  358.82 259.85 0 top
NOREF#517  -  []  238.37 259.8 0 top
NOREF#518  -  []  314.91 224.78 0 top
NOREF#519  -  []  349.17 238.73 90 top
NOREF#520  -  []  541.61 164.49 0 top
NOREF#521  -  []  480.78 186.81 90 top
NOREF#522  -  []  335.09 201.99 90 top
NOREF#523  -  []  547.86 196.96 0 top
NOREF#524  -  []  262.22 296.45 90 top
NOREF#525  -  []  240.37 135.17 0 top
NOREF#526  -  []  309.28 241.06 0 top
NOREF#527  -  []  112.42 136.82 90 top
NOREF#528  -  []  335.76 180.75 0 top
NOREF#529  -  []  238.17 194.55 90 top
NOREF#530  -  []  251.96 253.56 90 top
NOREF#531  -  []  335.16 179.65 90 top
NOREF#532  -  []  476.48 192.81 0 top
NOREF#533  -  []  224.96 136.89 0 top
NOREF#534  -  []  457.43 161.06 0 top
NOREF#535  -  []  236.16 249.57 90 top
NOREF#536  -  []  310.13 207.46 90 top
NOREF#537  -  []  225.48 173.73 90 top
NOREF#538  -  []  295.05 484.08 0 top
NOREF#539  -  []  310.59 240.4 0 top
NOREF#540  -  []  -566.99 200.32 0 top
NOREF#541  -  []  320.12 262.82 0 top
NOREF#542  -  []  333.61 182 0 top
NOREF#543  -  []  549.44 238.1 90 top
NOREF#544  -  []  198.56 287.03 90 top
NOREF#545  -  []  213.09 195.5 0 top
NOREF#546  -  []  215.01 182 90 top
NOREF#547  -  []  212.33 253.86 90 top
NOREF#548  -  []  253.61 182 0 top
NOREF#549  -  []  37.98 484.08 0 top
NOREF#550  -  []  275.12 299.77 90 top
NOREF#551  -  []  227.05 135.09 90 top
NOREF#552  -  []  307 260.55 0 top
NOREF#553  -  []  231.21 245.61 0 top
NOREF#554  -  []  560.92 149.79 90 top
NOREF#555  -  []  97.76 134.11 0 top
NOREF#556  -  []  234.44 144.1 0 top
NOREF#557  -  []  308.95 259.78 90 top
NOREF#558  -  []  275.3 190.05 0 top
NOREF#559  -  []  360.37 135.17 0 top
NOREF#560  -  []  226.84 149.01 0 top
NOREF#561  -  []  272.13 244.72 90 top
NOREF#562  -  []  86.59 220.75 0 top
NOREF#563  -  []  353.49 295.27 90 top
NOREF#564  -  []  252.78 239.12 90 top
NOREF#565  -  []  303.09 234.94 0 top
NOREF#566  -  []  344.41 171.76 90 top
NOREF#567  -  []  87.81 145.57 0 top
NOREF#568  -  []  312.22 183.1 0 top
NOREF#569  -  []  264.52 285.16 90 top
NOREF#570  -  []  268.62 245.61 0 top
NOREF#571  -  []  268.09 268.12 0 top
NOREF#572  -  []  103.64 229.59 0 top
NOREF#573  -  []  271.89 244.88 90 top
NOREF#574  -  []  485.88 158.26 0 top
NOREF#575  -  []  304.91 233.9 0 top
NOREF#576  -  []  347.25 173.9 90 top
NOREF#577  -  []  298.44 299.07 0 top
NOREF#578  -  []  144.91 483.84 90 top
NOREF#579  -  []  423.56 417.57 90 top
NOREF#580  -  []  356.52 134.08 90 top
NOREF#581  -  []  313.63 143.53 0 top
NOREF#582  -  []  293.86 192.91 90 top
NOREF#583  -  []  313.11 250.23 90 top
NOREF#584  -  []  375.73 463.08 90 top
NOREF#585  -  []  360.07 462.53 90 top
NOREF#586  -  []  213.22 250.39 90 top
NOREF#587  -  []  349.83 209.1 90 top
NOREF#588  -  []  52.92 483.76 90 top
NOREF#589  -  []  -549.17 393.92 90 top
NOREF#590  -  []  304.87 484.08 0 top
NOREF#591  -  []  316.61 288.05 0 top
NOREF#592  -  []  553.49 163.32 90 top
NOREF#593  -  []  333.39 255.18 0 top
NOREF#594  -  []  317.14 141.43 90 top
NOREF#595  -  []  354.21 249.57 90 top
NOREF#596  -  []  225.44 146.16 90 top
NOREF#597  -  []  493.48 155.06 90 top
NOREF#598  -  []  102.38 141.22 0 top
NOREF#599  -  []  222.45 231.5 0 top
NOREF#600  -  []  270.82 240.82 90 top
NOREF#601  -  []  263.95 233.9 90 top
NOREF#602  -  []  355.23 163.88 90 top
NOREF#603  -  []  306.54 135.09 0 top
NOREF#604  -  []  304.57 484.4 0 top
NOREF#605  -  []  348.93 208.11 0 top
NOREF#606  -  []  124.28 140.9 90 top
NOREF#607  -  []  347 260.55 0 top
NOREF#608  -  []  -563.26 196.56 90 top
NOREF#609  -  []  229.18 238.73 90 top
NOREF#610  -  []  268.25 174.12 0 top
NOREF#611  -  []  219.33 196.13 0 top
NOREF#612  -  []  344.24 207.14 0 top
NOREF#613  -  []  -554.95 325.06 0 top
NOREF#614  -  []  114.42 139.32 0 top
NOREF#615  -  []  334.68 193.86 90 top
NOREF#616  -  []  266.63 241.83 90 top
NOREF#617  -  []  352.05 238.99 0 top
NOREF#618  -  []  89.64 154.45 0 top
NOREF#619  -  []  -570.59 267.18 90 top
NOREF#620  -  []  307.25 174.3 90 top
NOREF#621  -  []  328.72 484.08 0 top
NOREF#622  -  []  234.21 249.57 90 top
NOREF#623  -  []  213.29 193.86 90 top
NOREF#624  -  []  291.34 254.86 0 top
NOREF#625  -  []  272.91 241.11 90 top
NOREF#626  -  []  85.87 295.23 0 top
NOREF#627  -  []  116.75 229.07 90 top
NOREF#628  -  []  458.47 236.22 90 top
NOREF#629  -  []  232.46 250.23 90 top
NOREF#630  -  []  232.8 247.31 90 top
NOREF#631  -  []  348.95 259.88 0 top
NOREF#632  -  []  478.78 255.51 0 top
NOREF#633  -  []  315.48 297.35 0 top
NOREF#634  -  []  253.39 183.61 0 top
NOREF#635  -  []  223.95 232.42 90 top
NOREF#636  -  []  485.88 158.26 0 top
NOREF#637  -  []  454.13 221.76 0 top
NOREF#638  -  []  267 260.55 0 top
NOREF#639  -  []  353.62 183.41 0 top
NOREF#640  -  []  254.2 209.34 90 top
NOREF#641  -  []  252.78 179.12 90 top
NOREF#642  -  []  310.62 185.85 0 top
NOREF#643  -  []  324.51 484.08 0 top
NOREF#644  -  []  231.71 184.72 0 top
NOREF#645  -  []  73.51 294.22 90 top
NOREF#646  -  []  226.54 133.3 90 top
NOREF#647  -  []  313.99 208.8 0 top
NOREF#648  -  []  301.81 264.2 0 top
NOREF#649  -  []  309.94 186.26 0 top
NOREF#650  -  []  541.61 147.98 0 top
NOREF#651  -  []  113.09 249.7 0 top
NOREF#652  -  []  317.95 135.78 90 top
NOREF#653  -  []  552.28 147.98 0 top
NOREF#654  -  []  312.46 242.42 90 top
NOREF#655  -  []  549.44 235.3 90 top
NOREF#656  -  []  273.07 254.55 0 top
NOREF#657  -  []  234.23 187.83 0 top
NOREF#658  -  []  295.49 194.86 90 top
NOREF#659  -  []  241.08 201.38 90 top
NOREF#660  -  []  303.09 174.38 0 top
NOREF#661  -  []  91.44 302.01 0 top
NOREF#662  -  []  62.34 484.4 0 top
NOREF#663  -  []  307.56 144.79 0 top
NOREF#664  -  []  451.08 224.56 0 top
NOREF#665  -  []  229.59 259.88 90 top
NOREF#666  -  []  304.24 207.14 0 top
NOREF#667  -  []  232.26 181.11 90 top
NOREF#668  -  []  292.33 182.3 90 top
NOREF#669  -  []  354.44 146.64 0 top
NOREF#670  -  []  156.86 484.08 0 top
NOREF#671  -  []  548.65 417.57 90 top
NOREF#672  -  []  367.5 483.75 90 top
NOREF#673  -  []  255.56 240.9 90 top
NOREF#674  -  []  268.62 184.96 0 top
NOREF#675  -  []  346.63 241.83 90 top
NOREF#676  -  []  459.73 160.26 0 top
NOREF#677  -  []  348.03 292.21 0 top
NOREF#678  -  []  351.4 186.13 0 top
NOREF#679  -  []  354.21 189.57 90 top
NOREF#680  -  []  111.99 220.75 0 top
NOREF#681  -  []  220.67 292.95 0 top
NOREF#682  -  []  111.42 222.97 0 top
NOREF#683  -  []  509.92 229.28 0 top
NOREF#684  -  []  80.24 252.5 0 top
NOREF#685  -  []  329.83 225.63 90 top
NOREF#686  -  []  212.54 194.86 90 top
NOREF#687  -  []  114.29 251.7 0 top
NOREF#688  -  []  210.61 192.27 0 top
NOREF#689  -  []  268.55 238.53 90 top
NOREF#690  -  []  268.67 181.95 0 top
NOREF#691  -  []  481.53 160.91 90 top
NOREF#692  -  []  228.32 239.21 0 top
NOREF#693  -  []  365.72 467.68 0 top
NOREF#694  -  []  458.47 204.47 0 top
NOREF#695  -  []  474 165.84 0 top
NOREF#696  -  []  78.8 291.62 0 top
NOREF#697  -  []  335.38 242.3 90 top
NOREF#698  -  []  301.26 254.55 0 top
NOREF#699  -  []  350.59 244.96 0 top
NOREF#700  -  []  508.11 209.79 90 top
NOREF#701  -  []  516.36 239.64 0 top
NOREF#702  -  []  307.25 234.3 90 top
NOREF#703  -  []  266.85 250.05 0 top
NOREF#704  -  []  322.43 269.89 0 top
NOREF#705  -  []  359.1 143.77 0 top
NOREF#706  -  []  159.66 484.08 0 top
NOREF#707  -  []  279.77 263.03 0 top
NOREF#708  -  []  270.5 243.72 90 top
NOREF#709  -  []  233.02 254.4 0 top
NOREF#710  -  []  -570.05 267.66 0 top
NOREF#711  -  []  553.49 146.81 90 top
NOREF#712  -  []  227.65 260.55 90 top
NOREF#713  -  []  269.25 134 0 top
NOREF#714  -  []  533.93 209.21 0 top
NOREF#715  -  []  94.33 285.82 0 top
NOREF#716  -  []  235.06 190.23 90 top
NOREF#717  -  []  252.66 253.56 90 top
NOREF#718  -  []  95.99 154.45 0 top
NOREF#719  -  []  104.34 188.85 90 top
NOREF#720  -  []  352.05 181.59 0 top
NOREF#721  -  []  253.09 254.86 90 top
NOREF#722  -  []  309.3 245.85 0 top
NOREF#723  -  []  266.56 259.8 0 top
NOREF#724  -  []  153.33 483.84 90 top
NOREF#725  -  []  239.73 246.59 0 top
NOREF#726  -  []  213.22 238.82 90 top
NOREF#727  -  []  224.41 231.76 90 top
NOREF#728  -  []  289.83 165.63 90 top
NOREF#729  -  []  304.78 261.82 0 top
NOREF#730  -  []  548.24 235.95 0 top
NOREF#731  -  []  487.59 169.38 90 top
NOREF#732  -  []  307.95 261.38 0 top
NOREF#733  -  []  315.48 299.38 0 top
NOREF#734  -  []  271.16 243.72 90 top
NOREF#735  -  []  361.08 263.12 90 top
NOREF#736  -  []  540.94 233.23 0 top
NOREF#737  -  []  312.23 167.99 90 top
NOREF#738  -  []  307.99 181.06 0 top
NOREF#739  -  []  335.1 274.12 0 top
NOREF#740  -  []  336.21 192.91 90 top
NOREF#741  -  []  48.35 266.27 0 top
NOREF#742  -  []  354.1 286.98 90 top
NOREF#743  -  []  354.92 467.68 0 top
NOREF#744  -  []  237.14 141.43 90 top
NOREF#745  -  []  296.15 484.4 0 top
NOREF#746  -  []  351.02 185.37 0 top
NOREF#747  -  []  292.78 190.69 90 top
NOREF#748  -  []  305.44 146.16 90 top
NOREF#749  -  []  301.82 296.65 90 top
NOREF#750  -  []  230.5 250.23 90 top
NOREF#751  -  []  224.78 261.82 0 top
NOREF#752  -  []  229.59 199.88 90 top
NOREF#753  -  []  245.83 169.63 90 top
NOREF#754  -  []  161.07 484.08 0 top
NOREF#755  -  []  256.91 192.91 90 top
NOREF#756  -  []  291.96 193.56 0 top
NOREF#757  -  []  265.03 261.06 0 top
NOREF#758  -  []  317.11 224.14 90 top
NOREF#759  -  []  291.64 193.86 90 top
NOREF#760  -  []  323.11 484.08 0 top
NOREF#761  -  []  213.22 191.59 0 top
NOREF#762  -  []  490.86 167.88 90 top
NOREF#763  -  []  568.42 166.3 0 top
NOREF#764  -  []  318.82 259.15 0 top
NOREF#765  -  []  310.82 240.82 90 top
NOREF#766  -  []  312.25 249.57 90 top
NOREF#767  -  []  87.69 154.45 0 top
NOREF#768  -  []  268.67 241.29 0 top
NOREF#769  -  []  356.59 262.58 0 top
NOREF#770  -  []  344.52 291.64 0 top
NOREF#771  -  []  239.02 259.8 90 top
NOREF#772  -  []  213.09 183.93 0 top
NOREF#773  -  []  252.78 250.69 90 top
NOREF#774  -  []  273.11 243.75 90 top
NOREF#775  -  []  239.77 199.98 0 top
NOREF#776  -  []  -564.12 197.04 0 top
